# Altium PCB Solenoid-Board-v2.0.PcbDoc (part 2 of 3)
Units mil, origin at the board's own origin, x right, y up, seen from the top; angles counter-clockwise.
Board outline 3149.61 x 4330.71 mil, 2 copper layers (Top Layer, Bottom Layer), stack 61.811 mil thick; 169 components, 111 nets, 466 pads, 161 vias.
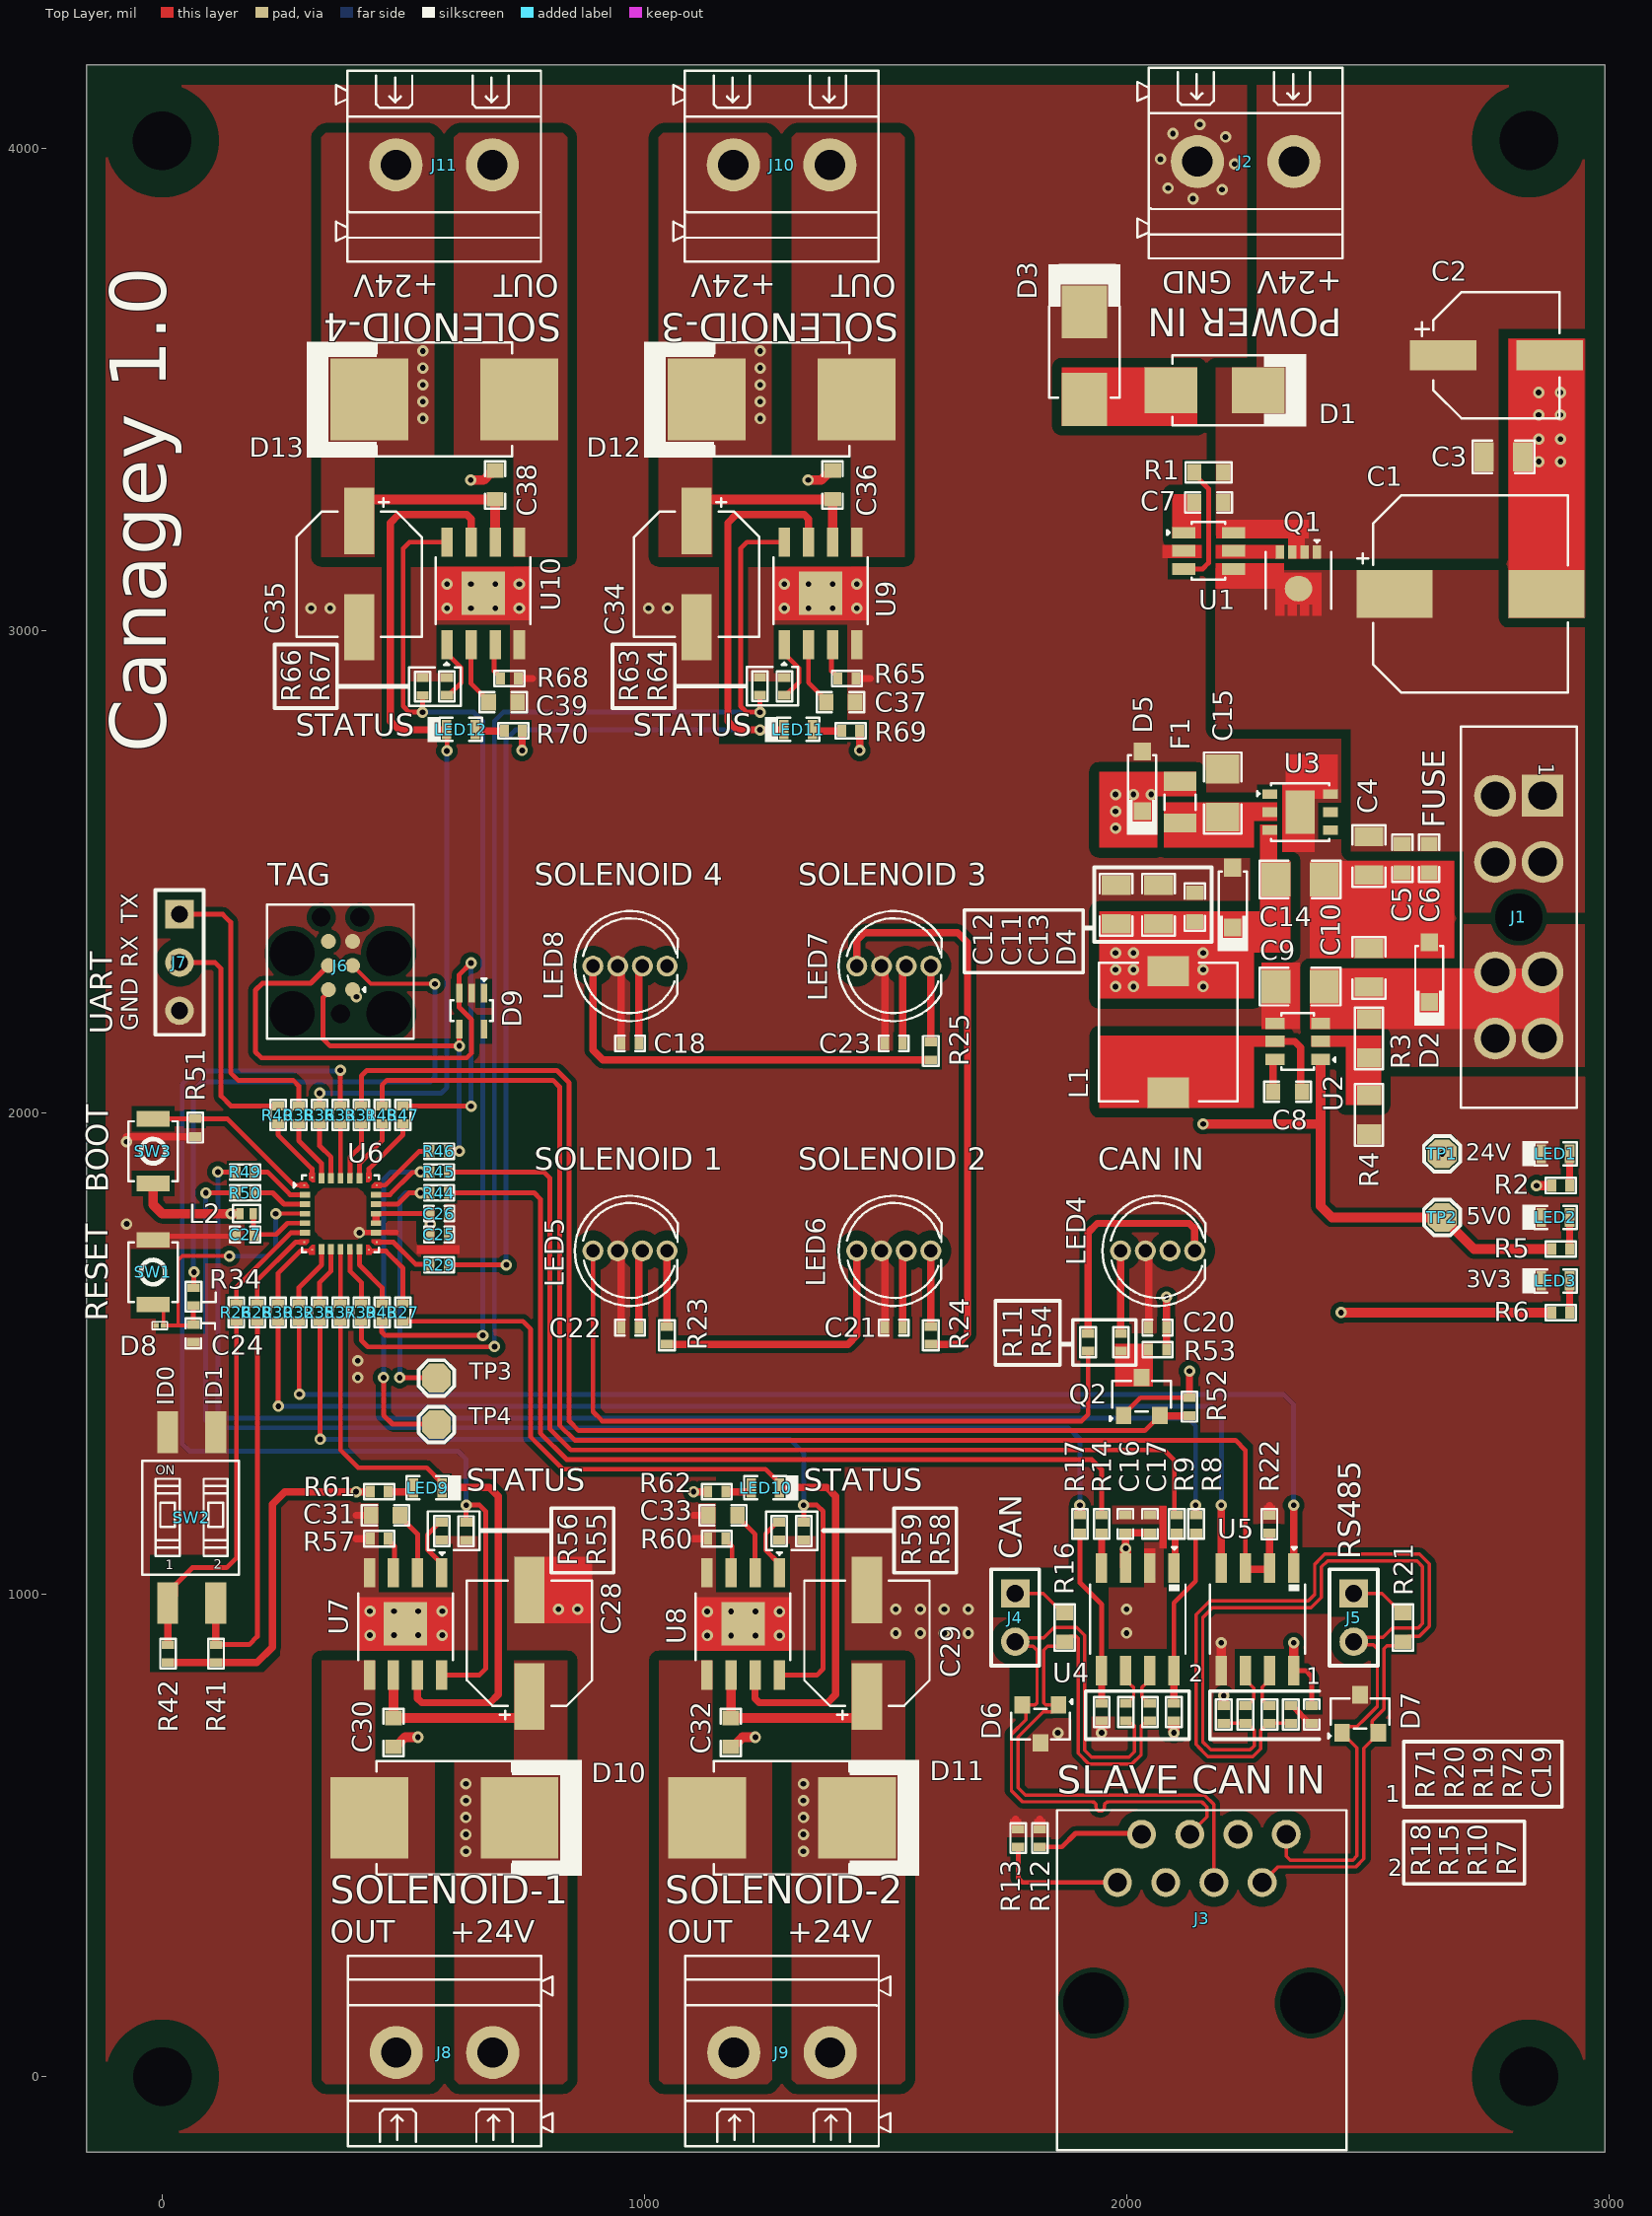
[diagram p0: Top Layer view]

## Part data (continued)
LED4 LED5 LED6 LED7 LED8: "Plugin,D=5mm RGB LEDs ROHS", LCSC Part Number=C190565, Manufacturer=Worldsemi, Package=Plugin,D=5mm, ComponentLink1Description=LCSC, ComponentLink1URL=https://jlcpcb.com/partdetail/Worldsemi-WS2812DF5/C190565, Item Type="RGB LED", Manufacturer Part Number=WS2812D-F5
Q1: "MOSFET N-CH 60V 15A PWRDI3333", Continuous Drain Current (ID)=80A, Drain to Source Voltage (Vdss)=60V, Input Capacitance=2.09nF, LCSC Part Number=C2802568, Manufacturer=Diodes, Max Operating Temperature=150°C, Max Power Dissipation=2.2W, Min Operating Temperature=-55°C, ComponentLink1Description=http://www.mouser.com/ds/2/115/DMT6007LFG-792694.pdf?src-supplier=Mouser, ComponentLink1URL=http://www.mouser.com/ds/2/115/DMT6007LFG-792694.pdf?src-supplier=Mouser, ComponentLink2Description=https://www.diodes.com/assets/Datasheets/DMT6007LFG.pdf?src-supplier=Digikey, ComponentLink2URL=https://www.diodes.com/assets/Datasheets/DMT6007LFG.pdf?src-supplier=Digikey, Item Type=MOSFETs, Manufacturer Part Number=DMT6007LFG-7, Mounting Technology="Surface Mount", Packaging="Cut Tape", Pins=8, Pricing="1=1.33, 10=0.897, 100=0.628, 500=0.50734, 1000=0.46783 (USD)", Rds On Max=6mR, RoHS=Yes, RoHS Compliant=Yes, Series=-, Stock=22065, Supplier=Digikey
Q2: "N-CHANNEL 20-V (D-S) MOSFET", LCSC Part Number=C5310968, Manufacturer="TECH PUBLIC", Manufacturer Part Number=SI2302CDS, Package=SOT-23, ComponentLink1Description=LCSC, ComponentLink1URL=https://www.lcsc.com/product-detail/MOSFETs_TECH-PUBLIC-SI2302CDS_C5310968.html, Item Type=Mosfet
R1: library part RC0603JR-07100KL, "RES 100K OHM 5% 1/10W 0603", Case Code (Imperial)=0603, Case Code (Metric)=1608, LCSC Part Number=C100048, Manufacturer=Yageo, Max Operating Temperature=155°C, Max Power Dissipation=100mW, Min Operating Temperature=-55°C, Resistance=100kR, Resistance Tolerance=5%, Resistor Type="Thick Film", Supplier Part Number 1=311-100KGRCT-ND, Temperature Coefficient=100ppm/°C, Voltage Rating=50V, Case/Package=0603, Category="Chip SMD Resistors", ComponentLink1Description=https://datasheet.ciiva.com/7746/443971-7746424.pdf?src-supplier=Element14, ComponentLink1URL=https://datasheet.ciiva.com/7746/443971-7746424.pdf?src-supplier=Element14, ComponentLink2Description=https://datasheet.ciiva.com/7983/443971-7983686.pdf?src-supplier=Element14, ComponentLink2URL=https://datasheet.ciiva.com/7983/443971-7983686.pdf?src-supplier=Element14, ComponentLink3Description=https://datasheet.ciiva.com/7746/443971-7746423.pdf?src-supplier=Element14, ComponentLink3URL=https://datasheet.ciiva.com/7746/443971-7746423.pdf?src-supplier=Element14, ComponentLink4Description=https://datasheet.ciiva.com/8887/pyu-rc0603-51-rohs-l-4-8887903.pdf?src-supplier=Avnet, ComponentLink4URL=https://datasheet.ciiva.com/8887/pyu-rc0603-51-rohs-l-4-8887903.pdf?src-supplier=Avnet, Contact Plating=Tin,Matte, Features="Moisture Resistant", Item Type=Resistor, Lead Free="Lead Free", Manufacturer Part Number=RC0603JR-07100KL, Number of Pins=2, Number of Terminations=2, Packaging="Tape and Reel", Power Rating=100mW, Pricing 1="1=0.10000, 10=0.02000, 100=0.00800, 1000=0.00360, 2500=0.00312 (USD)", Radiation Hardening=No, REACH SVHC="No SVHC", RoHS=Yes, RoHS Compliant=Yes, Series=RC, Size Code=0603, Stock 1=1210037, Supplier 1=Digi-Key, Termination=SMD/SMT, Tolerance=5%, Voltage Rating (DC)=50V, Width=0.8mm
R2: library part RC0402FR-073K9L, "RES 3.9K OHM 1% 1/16W 0402", Case Code (Imperial)=0402, Case Code (Metric)=1005, LCSC Part Number=C131467, Manufacturer=Yageo, Max Operating Temperature=155°C, Max Power Dissipation=63mW, Min Operating Temperature=-55°C, Power Rating=62.5mW, Resistance Tolerance=1%, Resistor Type="Thick Film", Supplier Part Number=9808155, Temperature Coefficient=100ppm/°C, Voltage Rating=50V, Case/Package=0402, Category="Chip SMD Resistors", ComponentLink1Description=https://datasheet.ciiva.com/12666/pyu-rc0402-51-rohs-l-6-r-12666997.pdf?src-supplier=Mouser, ComponentLink1URL=https://datasheet.ciiva.com/12666/pyu-rc0402-51-rohs-l-6-r-12666997.pdf?src-supplier=Mouser, ComponentLink2Description=https://datasheet.ciiva.com/7849/1018594-7849989.pdf?src-supplier=Element14, ComponentLink2URL=https://datasheet.ciiva.com/7849/1018594-7849989.pdf?src-supplier=Element14, ComponentLink3Description=https://datasheet.ciiva.com/7849/1018594-7849990.pdf?src-supplier=Element14, ComponentLink3URL=https://datasheet.ciiva.com/7849/1018594-7849990.pdf?src-supplier=Element14, ComponentLink4Description=https://datasheet.ciiva.com/15189/getdatasheetpartid-469246-15189453.pdf?src-supplier=Verical, ComponentLink4URL=https://datasheet.ciiva.com/15189/getdatasheetpartid-469246-15189453.pdf?src-supplier=Verical, Construction=Rectangular, Depth=0.5mm, Features="Moisture Resistant", Item Type=Resistor, Lead Free="Lead Free", Length=1mm, Manufacturer Part Number=RC0402FR-073K9L, Military Standard=Not, Number of Terminations=2, Packaging="Tape and Reel", Pricing="10000=0.0011, 100000=0.0011, 300000=0.001, 750000=0.001, 2000000=0.0009 (USD)", Reach SVHC Compliant=Unknown, RoHS=Yes, RoHS Compliant=Yes, Series=RC, Stock=6910000, Supplier="Future Electronics", Termination=SMD/SMT, Tolerance=1%, Voltage Rating (AC)=50V
R3: library part RT0805BRD07698KL, "RES SMD 698K OHM 0.1% 1/8W 0805", Case Code (Imperial)=0805, Case Code (Metric)=2012, LCSC Part Number=C865618, Manufacturer=Yageo, Max Operating Temperature=155°C, Max Power Dissipation=125mW, Min Operating Temperature=-55°C, Package Quantity=5000, Temperature Coefficient=25ppm/°C, Tolerance=0.1%, Voltage Rating=150V, Case/Package=0805, ComponentLink1Description=https://datasheet.ciiva.com/2585/pyu-rt-1-to-0-05-rohs-l-4-2585147.pdf?src-supplier=Digikey, ComponentLink1URL=https://datasheet.ciiva.com/2585/pyu-rt-1-to-0-05-rohs-l-4-2585147.pdf?src-supplier=Digikey, ComponentLink2Description=https://datasheet.ciiva.com/46635/pyu-rt-1-to-0-05-rohs-l-5-46635259.pdf?src-supplier=Digikey, ComponentLink2URL=https://datasheet.ciiva.com/46635/pyu-rt-1-to-0-05-rohs-l-5-46635259.pdf?src-supplier=Digikey, ComponentLink3Description=https://datasheet.ciiva.com/12705/pyu-rt-1-to-0-05-rohs-l-4-12705823.pdf?src-supplier=Mouser, ComponentLink3URL=https://datasheet.ciiva.com/12705/pyu-rt-1-to-0-05-rohs-l-4-12705823.pdf?src-supplier=Mouser, Features="Moisture Resistant", Height=0.024inch, Item Type=Resistor, Lead Free="Lead Free", Length=0.079inch, Manufacturer Part Number=RT0805BRD07698KL, Number of Terminations=2, Packaging="Tape and Reel", Power Rating=125mW, Pricing="1=0.16, 10=0.122, 50=0.0968, 100=0.0867, 500=0.0663, 1000=0.05814 (USD)", RoHS=Yes, RoHS Compliant=Yes, Series=RT, Stock=881, Supplier=Digikey, Termination=SMD/SMT, Voltage Rating (DC)=150V, Width=0.049inch
R4: library part RT0805BRD0751K1L, "RES SMD 51.1K OHM 0.1% 1/8W 0805", Case Code (Imperial)=0805, Case Code (Metric)=2012, LCSC Part Number=C865541, Manufacturer=Yageo, Max Operating Temperature=155°C, Max Power Dissipation=125mW, Min Operating Temperature=-55°C, Package Quantity=5000, Temperature Coefficient=25ppm/°C, Tolerance=0.1%, Voltage Rating=150V, Case/Package=0805, ComponentLink1Description=https://datasheet.ciiva.com/12811/pyu-rt-1-to-0-05-rohs-l-4-12811148.pdf?src-supplier=Mouser, ComponentLink1URL=https://datasheet.ciiva.com/12811/pyu-rt-1-to-0-05-rohs-l-4-12811148.pdf?src-supplier=Mouser, ComponentLink2Description=https://datasheet.ciiva.com/2585/pyu-rt-1-to-0-05-rohs-l-5-2585074.pdf?src-supplier=Digikey, ComponentLink2URL=https://datasheet.ciiva.com/2585/pyu-rt-1-to-0-05-rohs-l-5-2585074.pdf?src-supplier=Digikey, Height=0.024inch, Item Type=Resistors, Lead Free="Lead Free", Length=0.079inch, Manufacturer Part Number=RT0805BRD0751K1L, Number of Terminations=2, Packaging="Tape and Reel", Power Rating=125mW, Pricing="1=0.16, 10=0.122, 50=0.0968, 100=0.0867, 500=0.0663, 1000=0.05814 (USD)", RoHS=Yes, RoHS Compliant=Yes, Series=RT, Stock=5132, Supplier=Digikey, Termination=SMD/SMT, Voltage Rating (DC)=150V, Weight=0.000194oz, Width=1.2mm
R5: library part RC0402FR-07499RL, "RES 499 OHM 1% 1/16W 0402", Case Code (Imperial)=0402, Case Code (Metric)=1005, LCSC Part Number=C137970, Manufacturer=Yageo, Max Operating Temperature=155°C, Max Power Dissipation=63mW, Min Operating Temperature=-55°C, Package Quantity=1, Power Rating=62.5mW, Resistance Tolerance=1%, Resistor Type="Thick Film", Supplier Part Number 1=603-RC0402FR-07499RL, Temperature Coefficient=100ppm/°C, Voltage Rating=50V, Case/Package=0402, Category="Chip SMD Resistors", ComponentLink1Description=https://datasheet.ciiva.com/2453/pyu-r-int-thick-7-2453539.pdf?src-supplier=Digi-Key, ComponentLink1URL=https://datasheet.ciiva.com/2453/pyu-r-int-thick-7-2453539.pdf?src-supplier=Digi-Key, ComponentLink2Description=https://datasheet.ciiva.com/2453/pyu-r-int-thick-7-2453540.pdf?src-supplier=Digi-Key, ComponentLink2URL=https://datasheet.ciiva.com/2453/pyu-r-int-thick-7-2453540.pdf?src-supplier=Digi-Key, ComponentLink3Description=https://datasheet.ciiva.com/2453/pyu-r-int-thick-7-2453538.pdf?src-supplier=Digi-Key, ComponentLink3URL=https://datasheet.ciiva.com/2453/pyu-r-int-thick-7-2453538.pdf?src-supplier=Digi-Key, Construction=Rectangular, Depth=0.5mm, Features="Moisture Resistant", Height=0.016inch, Lead Free="Lead Free", Length=1mm, Manufacturer Part Number=RC0402FR-07499RL, Military Standard=Not, Number of Terminations=2, Packaging="Tape and Reel", Pricing 1="1=0.10000, 10=0.01200, 50=0.01200, 100=0.00500, 1000=0.00300, 10000=0.00100 (USD)", REACH SVHC="No SVHC", Resistance=499R, RoHS=Yes, RoHS Compliant=Yes, Series=RC, Size Code=0402, Stock 1=936879, Supplier 1=Mouser, Termination=SMD/SMT, Tolerance=1%, Voltage Rating (DC)=50V, Width=0.02inch
R6 R61 R62 R69 R70: library part RC0402FR-07240RL, "RES 240 OHM 1% 1/16W 0402", Case Code (Imperial)=0402, Case Code (Metric)=1005, LCSC Part Number=C114755, Manufacturer=Yageo, Max Operating Temperature=155°C, Max Power Dissipation=63mW, Min Operating Temperature=-55°C, Package Quantity=1, Resistance Tolerance=1%, Resistor Type="Thick Film", Supplier Part Number 1=603-RC0402FR-07240RL, Temperature Coefficient=100ppm/°C, Voltage Rating=50V, Case/Package=0402, ComponentLink1Description=https://datasheet.ciiva.com/7849/1018594-7849915.pdf?src-supplier=Element14, ComponentLink1URL=https://datasheet.ciiva.com/7849/1018594-7849915.pdf?src-supplier=Element14, ComponentLink2Description=https://datasheet.ciiva.com/7849/1018594-7849916.pdf?src-supplier=Element14, ComponentLink2URL=https://datasheet.ciiva.com/7849/1018594-7849916.pdf?src-supplier=Element14, ComponentLink3Description=https://datasheet.ciiva.com/2519/pyu-r-int-thick-7-2519157.pdf?src-supplier=Digi-Key, ComponentLink3URL=https://datasheet.ciiva.com/2519/pyu-r-int-thick-7-2519157.pdf?src-supplier=Digi-Key, ComponentLink4Description=https://datasheet.ciiva.com/2519/pyu-r-int-thick-7-2519158.pdf?src-supplier=Digi-Key, ComponentLink4URL=https://datasheet.ciiva.com/2519/pyu-r-int-thick-7-2519158.pdf?src-supplier=Digi-Key, ComponentLink5Description=https://datasheet.ciiva.com/2519/pyu-r-int-thick-7-2519156.pdf?src-supplier=Digi-Key, ComponentLink5URL=https://datasheet.ciiva.com/2519/pyu-r-int-thick-7-2519156.pdf?src-supplier=Digi-Key, ComponentLink6Description=https://datasheet.ciiva.com/12669/pyu-rc0402-51-rohs-l-6-r-12669689.pdf?src-supplier=Mouser, ComponentLink6URL=https://datasheet.ciiva.com/12669/pyu-rc0402-51-rohs-l-6-r-12669689.pdf?src-supplier=Mouser, ComponentLink7Description=https://datasheet.ciiva.com/17419/pyu-rc0402-51-rohs-l-6-r-17419482.pdf?src-supplier=Future+Electronics, ComponentLink7URL=https://datasheet.ciiva.com/17419/pyu-rc0402-51-rohs-l-6-r-17419482.pdf?src-supplier=Future+Electronics, Construction=Rectangular, Depth=0.5mm, Features="Moisture Resistant", Height=0.016inch, Item Type=Resistors, Lead Free="Lead Free", Length=1mm, Manufacturer Part Number=RC0402FR-07240RL, Military Standard=Not, Number of Terminations=2, Packaging="Tape and Reel", Power Rating=63mW, Pricing 1="1=0.10000, 10=0.01200, 50=0.01200, 100=0.00500, 1000=0.00300, 10000=0.00100 (USD)", REACH SVHC=Unknown, Resistance=240R, RoHS=Yes, RoHS Compliant=Yes, Series=RC, Size Code=0402, Stock 1=1903202, Supplier 1=Mouser, Termination=SMD/SMT, Tolerance=1%, Voltage Rating (DC)=50V, Width=0.02inch
R7 R18 R22 R41 R42 R51 R52 R53 R55 R58 R63 R66: library part RC0402FR-0710KL, "RES 10K OHM 1% 1/16W 0402", Case Code (Imperial)=0402, Case Code (Metric)=1005, LCSC Part Number=C60490, Manufacturer=Yageo, Max Operating Temperature=155°C, Max Power Dissipation=63mW, Min Operating Temperature=-55°C, Power Rating=62.5mW, Resistance=10kR, Resistance Tolerance=1%, Resistor Type="Thick Film", Supplier Part Number 1=603-RC0402FR-0710KL, Temperature Coefficient=100ppm/°C, Voltage Rating=50V, Case/Package=0402, Category="Chip SMD Resistors", ComponentLink1Description=https://datasheet.ciiva.com/7660/38568-7660787.pdf?src-supplier=Element14, ComponentLink1URL=https://datasheet.ciiva.com/7660/38568-7660787.pdf?src-supplier=Element14, ComponentLink2Description=https://datasheet.ciiva.com/7849/1686128-7849814.pdf?src-supplier=Element14, ComponentLink2URL=https://datasheet.ciiva.com/7849/1686128-7849814.pdf?src-supplier=Element14, ComponentLink3Description=https://datasheet.ciiva.com/7983/1018594-7983486.pdf?src-supplier=Element14, ComponentLink3URL=https://datasheet.ciiva.com/7983/1018594-7983486.pdf?src-supplier=Element14, ComponentLink4Description=https://datasheet.ciiva.com/22747/1018594-22747512.pdf?src-supplier=Element14, ComponentLink4URL=https://datasheet.ciiva.com/22747/1018594-22747512.pdf?src-supplier=Element14, ComponentLink5Description=https://datasheet.ciiva.com/12667/pyu-rc0402-51-rohs-l-6-r-12667067.pdf?src-supplier=Mouser, ComponentLink5URL=https://datasheet.ciiva.com/12667/pyu-rc0402-51-rohs-l-6-r-12667067.pdf?src-supplier=Mouser, ComponentLink6Description=https://datasheet.ciiva.com/7849/1784430-7849813.pdf?src-supplier=Element14, ComponentLink6URL=https://datasheet.ciiva.com/7849/1784430-7849813.pdf?src-supplier=Element14, ComponentLink7Description=https://datasheet.ciiva.com/7849/1784430-7849815.pdf?src-supplier=Element14, ComponentLink7URL=https://datasheet.ciiva.com/7849/1784430-7849815.pdf?src-supplier=Element14, Construction=Rectangular, Depth=0.5mm, Features="Moisture Resistant", Height=0.32mm, Item Type=Resistor, Lead Free="Lead Free", Lead Pitch=0.2mm, Length=1mm, Manufacturer Part Number=RC0402FR-0710KL, Military Standard=Not, Number of Pins=2, Number of Terminations=2, Packaging="Tape and Reel", Pricing 1="1=0.10000, 10=0.01400, 50=0.01400, 100=0.00500, 1000=0.00300, 10000=0.00200 (USD)", REACH SVHC="No SVHC", RoHS=Yes, RoHS Compliant=Yes, Series=RC, Stock 1=18648329, Supplier 1=Mouser, Termination=SMD/SMT, Tolerance=1%, Voltage Rating (DC)=50V, Width=0.5mm, Working Voltage=50V
R8 R9 R10 R12 R13 R14 R15 R17 R19 R20 R26 R27 R28 R29 R30 R31 R32 R33 R34 R35 R36 R37 R38 R39 R40 R43 R44 R45 R46 R47 R48 R49 R50: library part RC0402FR-070RL, "RES 0 OHM JUMPER 1/16W 0402", Case Code (Imperial)=0402, Case Code (Metric)=1005, LCSC Part Number=C106231, Manufacturer=Yageo, Max Operating Temperature=155°C, Max Power Dissipation=63mW, Min Operating Temperature=-55°C, Power Rating=62.5mW, Resistor Type="Thick Film", Supplier Part Number 1=603-RC0402FR-070RL, Temperature Coefficient=200ppm/°C, Tolerance=1%, Voltage Rating=50V, Case/Package=0402, ComponentLink1Description=https://datasheet.ciiva.com/8896/pyu-rc0402-51-rohs-l-6-8896149.pdf?src-supplier=Avnet, ComponentLink1URL=https://datasheet.ciiva.com/8896/pyu-rc0402-51-rohs-l-6-8896149.pdf?src-supplier=Avnet, ComponentLink2Description=https://datasheet.ciiva.com/16790/pyu-rc0402-51-rohs-l-6-r-16790444.pdf?src-supplier=Future+Electronics, ComponentLink2URL=https://datasheet.ciiva.com/16790/pyu-rc0402-51-rohs-l-6-r-16790444.pdf?src-supplier=Future+Electronics, Contact Plating=Tin,Matte, Features="Moisture Resistant", Height=0.35mm, Item Type=Resistors, Lead Free="Lead Free", Length=1mm, Manufacturer Part Number=RC0402FR-070RL, Mount="Surface Mount", Number of Terminations=2, Packaging="Tape and Reel", Pricing 1="1=0.10000, 10=0.01400, 50=0.01400, 100=0.00600, 1000=0.00300, 5000=0.00200, 10000=0.00100 (USD)", Radiation Hardening=No, Resistance=0R, RoHS=Yes, RoHS Compliant=Yes, Series=RC, Size Code=0402, Stock 1=8556842, Supplier 1=Mouser, Termination=SMD/SMT, Width=0.5mm
R11 R23 R24 R25 R54: library part RC0402JR-0775RL, "RES 75 OHM 5% 1/16W 0402", Case Code (Imperial)=0402, Case Code (Metric)=1005, LCSC Part Number=C137841, Manufacturer=Yageo, Max Operating Temperature=155°C, Max Power Dissipation=63mW, Min Operating Temperature=-55°C, Power Rating=62.5mW, Resistance Tolerance=5%, Resistor Type="Thick Film", Supplier Part Number=311-75JRCT-ND, Temperature Coefficient=100ppm/°C, Voltage Rating=50V, Case/Package=0402, ComponentLink1Description=https://datasheet.ciiva.com/7983/1018594-7983612.pdf?src-supplier=Element14, ComponentLink1URL=https://datasheet.ciiva.com/7983/1018594-7983612.pdf?src-supplier=Element14, ComponentLink2Description=https://datasheet.ciiva.com/17082/pyu-rc0402-51-rohs-l-6-r-17082239.pdf?src-supplier=Future+Electronics, ComponentLink2URL=https://datasheet.ciiva.com/17082/pyu-rc0402-51-rohs-l-6-r-17082239.pdf?src-supplier=Future+Electronics, Contact Plating=Tin,Lead, Features="Moisture Resistant", Height=0.35mm, Item Type=Resistor, Lead Free="Lead Free", Length=1mm, Manufacturer Part Number=RC0402JR-0775RL, Number of Terminations=2, Packaging="Tape and Reel", Pins=2, Pricing="1=0.1, 10=0.018, 50=0.0102, 100=0.0083, 500=0.00528, 1000=0.00444, 5000=0.00307 (USD)", Reach SVHC Compliant=No, RoHS=Yes, RoHS Compliant=Yes, Series=RC, Stock=2993323, Supplier=Digikey, Termination=SMD/SMT, Tolerance=5%, Voltage Rating (DC)=50V, Width=0.5mm
R16 R21: library part RC0603FR-07120RL, "RES 120 OHM 1% 1/10W 0603", Case Code (Imperial)=0603, Case Code (Metric)=1608, LCSC Part Number=C114640, Manufacturer=Yageo, Max Operating Temperature=155°C, Max Power Dissipation=100mW, Min Operating Temperature=-55°C, Package Quantity=1, Resistance Tolerance=1%, Resistor Type="Thick Film", Supplier Part Number 1=311-120HRCT-ND, Temperature Coefficient=100ppm/°C, Voltage Rating=50V, Case/Package=0603, Category="Chip SMD Resistors", ComponentLink1Description=https://datasheet.ciiva.com/2553/pyu-r-int-thick-7-2553512.pdf?src-supplier=Digi-Key, ComponentLink1URL=https://datasheet.ciiva.com/2553/pyu-r-int-thick-7-2553512.pdf?src-supplier=Digi-Key, ComponentLink2Description=https://datasheet.ciiva.com/7746/443971-7746248.pdf?src-supplier=Element14, ComponentLink2URL=https://datasheet.ciiva.com/7746/443971-7746248.pdf?src-supplier=Element14, ComponentLink3Description=https://datasheet.ciiva.com/2553/pyu-r-int-thick-7-2553513.pdf?src-supplier=Digi-Key, ComponentLink3URL=https://datasheet.ciiva.com/2553/pyu-r-int-thick-7-2553513.pdf?src-supplier=Digi-Key, ComponentLink4Description=https://datasheet.ciiva.com/7746/443971-7746249.pdf?src-supplier=Element14, ComponentLink4URL=https://datasheet.ciiva.com/7746/443971-7746249.pdf?src-supplier=Element14, ComponentLink5Description=https://datasheet.ciiva.com/2553/pyu-r-int-thick-7-2553514.pdf?src-supplier=Digi-Key, ComponentLink5URL=https://datasheet.ciiva.com/2553/pyu-r-int-thick-7-2553514.pdf?src-supplier=Digi-Key, ComponentLink6Description=https://datasheet.ciiva.com/46395/443971-46395021.pdf?src-supplier=Element14, ComponentLink6URL=https://datasheet.ciiva.com/46395/443971-46395021.pdf?src-supplier=Element14, Construction=Rectangular, Depth=0.8mm, Features="Moisture Resistant", Height=0.022inch, Item Type=Resistor, Lead Free="Lead Free", Length=1.6mm, Manufacturer Part Number=RC0603FR-07120RL, Military Standard=Not, Number of Pins=2, Number of Terminations=2, Packaging="Tape and Reel", Power Rating=100mW, Pricing 1="1=0.10000, 10=0.02400, 100=0.00970, 1000=0.00436, 2500=0.00378 (USD)", REACH SVHC="No SVHC", Resistance=120R, RoHS=Yes, RoHS Compliant=Yes, Series=RC, Size Code=0603, Stock 1=839061, Supplier 1=Digi-Key, Termination=SMD/SMT, Tolerance=1%, Voltage Rating (DC)=50V, Width=0.031inch
R56 R57 R59 R60 R64 R65 R67 R68: library part RC0402FR-071ML, "RES 1M OHM 1% 1/16W 0402", Case Code (Imperial)=0402, Case Code (Metric)=1005, LCSC Part Number=C138033, Manufacturer=Yageo, Max Operating Temperature=155°C, Max Power Dissipation=63mW, Min Operating Temperature=-55°C, Resistance Tolerance=1%, Resistor Type="Thick Film", Supplier Part Number=311-1.00MLRCT-ND, Temperature Coefficient=100ppm/°C, Voltage Rating=50V, Case/Package=0402, Category="Chip SMD Resistors", ComponentLink1Description=https://datasheet.ciiva.com/11808/0900766b80c66297-11808125.pdf?src-supplier=Rs, ComponentLink1URL=https://datasheet.ciiva.com/11808/0900766b80c66297-11808125.pdf?src-supplier=Rs, ComponentLink2Description=https://datasheet.ciiva.com/46394/1018594-46394951.pdf?src-supplier=Element14, ComponentLink2URL=https://datasheet.ciiva.com/46394/1018594-46394951.pdf?src-supplier=Element14, ComponentLink3Description=https://datasheet.ciiva.com/7849/1018594-7849883.pdf?src-supplier=Element14, ComponentLink3URL=https://datasheet.ciiva.com/7849/1018594-7849883.pdf?src-supplier=Element14, ComponentLink4Description=https://datasheet.ciiva.com/7849/1018594-7849882.pdf?src-supplier=Element14, ComponentLink4URL=https://datasheet.ciiva.com/7849/1018594-7849882.pdf?src-supplier=Element14, ComponentLink5Description=https://datasheet.ciiva.com/16741/pyu-rc0402-51-rohs-l-6-r-16741081.pdf?src-supplier=Future+Electronics, ComponentLink5URL=https://datasheet.ciiva.com/16741/pyu-rc0402-51-rohs-l-6-r-16741081.pdf?src-supplier=Future+Electronics, Construction=Rectangular, Depth=0.5mm, Features="Moisture Resistant", Height=0.32mm, Item Type=Resistor, Lead Free=5697LeadFree, Length=1mm, Manufacturer Part Number=RC0402FR-071ML, Military Standard=Not, Number of Terminations=2, Packaging="Tape and Reel", Power Rating=63mW, Pricing="1=0.1, 10=0.015, 50=0.0088, 100=0.0073, 500=0.00488, 1000=0.00417, 5000=0.00297 (USD)", Reach SVHC Compliant=Unknown, RoHS=Yes, RoHS Compliant=Yes, Series=RC, Stock=6516, Supplier=Digikey, Technology="THICK FILM", Termination=SMD/SMT, Tolerance=1%, Voltage Rating (AC)=50V
R71 R72: library part RC0402FR-07560RL, "RES 560 OHM 1% 1/16W 0402", Case Code (Imperial)=0402, Case Code (Metric)=1005, LCSC Part Number=C163460, Manufacturer=Yageo, Max Operating Temperature=155°C, Max Power Dissipation=63mW, Min Operating Temperature=-55°C, Package Quantity=1, Resistance Tolerance=1%, Resistor Type="Thick Film", Supplier Part Number=8872046, Temperature Coefficient=100ppm/°C, Voltage Rating=50V, Case/Package=0402, Category="Chip SMD Resistors", ComponentLink1Description=https://datasheet.ciiva.com/2453/pyu-r-int-thick-7-2453458.pdf?src-supplier=Digikey, ComponentLink1URL=https://datasheet.ciiva.com/2453/pyu-r-int-thick-7-2453458.pdf?src-supplier=Digikey, ComponentLink2Description=https://datasheet.ciiva.com/2453/pyu-r-int-thick-7-2453459.pdf?src-supplier=Digikey, ComponentLink2URL=https://datasheet.ciiva.com/2453/pyu-r-int-thick-7-2453459.pdf?src-supplier=Digikey, ComponentLink3Description=https://datasheet.ciiva.com/2453/pyu-r-int-thick-7-2453457.pdf?src-supplier=Digikey, ComponentLink3URL=https://datasheet.ciiva.com/2453/pyu-r-int-thick-7-2453457.pdf?src-supplier=Digikey, ComponentLink4Description=https://datasheet.ciiva.com/12558/pyu-rc0402-51-rohs-l-6-r-8721-12558383.pdf?src-supplier=Mouser, ComponentLink4URL=https://datasheet.ciiva.com/12558/pyu-rc0402-51-rohs-l-6-r-8721-12558383.pdf?src-supplier=Mouser, ComponentLink5Description=https://datasheet.ciiva.com/7850/1018594-7850042.pdf?src-supplier=Element14, ComponentLink5URL=https://datasheet.ciiva.com/7850/1018594-7850042.pdf?src-supplier=Element14, ComponentLink6Description=https://datasheet.ciiva.com/7850/1018594-7850043.pdf?src-supplier=Element14, ComponentLink6URL=https://datasheet.ciiva.com/7850/1018594-7850043.pdf?src-supplier=Element14, Construction=Rectangular, Depth=0.5mm, Features="Moisture Resistant", Height=0.016inch, Item Type=Resistor, Lead Free="Lead Free", Length=1mm, Manufacturer Part Number=RC0402FR-07560RL, Military Standard=Not, Number of Terminations=2, Packaging="Tape and Reel", Power Rating=63mW, Pricing="10000=0.0012, 100000=0.0011, 300000=0.0011, 1250000=0.001, 3000000=0.0009 (USD)", Reach SVHC Compliant=Unknown, RoHS=Yes, RoHS Compliant=Yes, Series=RC, Stock=1360000, Supplier="Future Electronics", Termination=SMD/SMT, Tolerance=1%, Width=0.02inch
SW1 SW3: "SWITCH TACTILE SPST-NO 0.05A 12V", Contact Current Rating=50mA, Contact Resistance=100mR, Insulation Resistance=100MR, LCSC Part Number=C231329, Manufacturer=Omron, Max Operating Temperature=70°C, Max Voltage Rating (DC)=12V, Min Operating Temperature=-25°C, Operating Force=1.5N, Package Quantity=1, Ratings="Dust Proof,IP40", Supplier Part Number 1=SW1020DKR-ND, Actuator Length=0.4mm, Actuator Type=Standard, ComponentLink1Description=http://www.farnell.com/datasheets/60838.pdf?src-supplier=Farnell, ComponentLink1URL=http://www.farnell.com/datasheets/60838.pdf?src-supplier=Farnell, ComponentLink2Description=http://www.farnell.com/datasheets/60838.pdf?src-supplier=Element14, ComponentLink2URL=http://www.farnell.com/datasheets/60838.pdf?src-supplier=Element14, ComponentLink3Description=https://omronfs.omron.com/en_US/ecb/products/pdf/en-b3u.pdf?src-supplier=Digi-Key, ComponentLink3URL=https://omronfs.omron.com/en_US/ecb/products/pdf/en-b3u.pdf?src-supplier=Digi-Key, ComponentLink4Description=http://www.omron.com/ecb/products/pdf/en-b3u.pdf?src-supplier=Digi-Key, ComponentLink4URL=http://www.omron.com/ecb/products/pdf/en-b3u.pdf?src-supplier=Digi-Key, ComponentLink5Description=https://www.distrelec.biz/Web/Downloads/he/et/B3U_eng_datasheet.pdf?mime=application%2Fpdf&src-supplier=Distrelec, ComponentLink5URL=https://www.distrelec.biz/Web/Downloads/he/et/B3U_eng_datasheet.pdf?mime=application%2Fpdf&src-supplier=Distrelec, ComponentLink6Description=http://www.onlinecomponents.com/productFiles/mf-OM/en-b3u.pdf?src-supplier=Onlinecomponents.com, ComponentLink6URL=http://www.onlinecomponents.com/productFiles/mf-OM/en-b3u.pdf?src-supplier=Onlinecomponents.com, ComponentLink7Description=https://www.verical.com/server-webapp/html/getDatasheet?partID=552554&src-supplier=Verical, ComponentLink7URL=https://www.verical.com/server-webapp/html/getDatasheet?partID=552554&src-supplier=Verical, ComponentLink8Description=http://www.farnell.com/datasheets/1685550.pdf?src-supplier=Element14, ComponentLink8URL=http://www.farnell.com/datasheets/1685550.pdf?src-supplier=Element14, ComponentLink9Description=http://www.farnell.com/datasheets/2610940.pdf?src-supplier=Farnell, ComponentLink9URL=http://www.farnell.com/datasheets/2610940.pdf?src-supplier=Farnell, ComponentLink10Description=https://www.alliedelec.com/m/d/4c8a9ef82804fc3c241a13c1e298fd73.pdf?src-supplier=Allied+Electronics, ComponentLink10URL=https://www.alliedelec.com/m/d/4c8a9ef82804fc3c241a13c1e298fd73.pdf?src-supplier=Allied+Electronics, Contact Material=Silver, Current Rating=50mA, Depth=2.5mm, Electrical Life=200000Cycles, Height=1.2mm, Illumination Type=Non-Illuminated,Illuminated, Item Type=Switch, Lead Free="Lead Free", Length=4mm, Manufacturer Part Number=B3U-1000P, Max Current Rating=50mA, Mechanical Life=200000Cycles, Mount="Surface Mount", Orientation=Straight, Packaging="Tape and Reel", Pricing 1="1=1, 10=0.961, 25=0.9064, 50=0.7976, 100=0.7251, 250=0.68888, 500=0.67074, 1000=0.52571 (USD)", REACH SVHC=Unknown, Stock 1=116454, Supplier 1=Digi-Key, Switch Function=Off-Mom, Switch Travel=0.15mm, Termination=SMD/SMT, Throw Configuration=SPST, Voltage Rating (DC)=12V, Weight=0.000776oz, Width=3mm
SW2: "2 positions SPST Black Flat Toggle, Raised Style SMD-4P,5.1x6mm DIP Switches ROHS", LCSC Part Number=C54949, Manufacturer=DongGuan, Package=SMD-4P,5.1x6mm, ComponentLink1Description=LCSC, ComponentLink1URL=https://www.lcsc.com/product-detail/DIP-Switches_DongGuan-KINGTEK-Industrial-Co-LTD-DSIC02LSGET_C54949.html?s_z=n_DSIC02LSGET, Item Type=Switch, Manufacturer Part Number=DSIC02LSGET
TP1 TP2 TP3 TP4: "Test Point ON", Item Type="TEST POINT"
U1: "OR Controller N+1 ORing Controller N-Channel 1:1 SOT-23-6", Case/Package=SOT-23-6, LCSC Part Number=C2941042, Manufacturer="Texas Instruments", Max Operating Temperature=125°C, Max Output current=5A, Max Supply Voltage=65V, Min Operating Temperature=-40°C, Min Supply Voltage=3.2V, Nominal Supply Current=80uA, Supplier Part Number=595-LM74700QDBVRQ1, Category="Power Management ICs", ComponentLink1Description=http://www.ti.com/general/docs/suppproductinfo.tsp?distId=10&amp;gotoUrl=http%3A%2F%2Fwww.ti.com%2Flit%2Fgpn%2Flm74700-q1&src-supplier=Digikey, ComponentLink1URL=http://www.ti.com/general/docs/suppproductinfo.tsp?distId=10&amp;gotoUrl=http%3A%2F%2Fwww.ti.com%2Flit%2Fgpn%2Flm74700-q1&src-supplier=Digikey, Height=1.45mm, Item Type=IC, Length=2.9mm, Manufacturer Part Number=LM74700QDBVRQ1, Mounting Technology="Surface Mount", Number of Outputs=1NUMBER, Pins=6NUMBER, Pricing="1=1.78, 10=1.6, 50=1.6, 100=1.28, 1000=0.877, 10000=0.756 (USD)", RoHS=Yes, RoHS Compliant=Yes, Series="Automotive, AEC-Q100", Stock=11505, Supplier=Mouser, Thickness=1.2mm, Turn-Off Delay Time=450ns, Turn-On Delay Time=1.4us, Width=1.6mm
U2: "IC REG BUCK 5V 2A TSOT26", LCSC Part Number=C2071056, Manufacturer=Diodes, Supplier Part Number 1=AP63205WU-7DICT-ND, Category="Voltage Regulators - Switching", Item Type=IC, Manufacturer Part Number=AP63205WU-7, Pricing 1="1=0.88, 10=0.776, 25=0.7292, 100=0.5952, 250=0.55284, 500=0.4705, 1000=0.3764 (USD)", RoHS=Yes, Stock 1=88525, Supplier 1=Digi-Key
U3: "IC REG LINEAR 3.3V 1.3A 6DFN", LCSC Part Number=C283488, Manufacturer=STMicroelectronics, ComponentLink1Description=https://datasheet.ciiva.com/2053/cd00186925-2053848.pdf?src-supplier=Digikey, ComponentLink1URL=https://datasheet.ciiva.com/2053/cd00186925-2053848.pdf?src-supplier=Digikey, ComponentLink2Description=https://datasheet.ciiva.com/2053/cd00186925-2053849.pdf?src-supplier=Digikey, ComponentLink2URL=https://datasheet.ciiva.com/2053/cd00186925-2053849.pdf?src-supplier=Digikey, ComponentLink3Description=https://datasheet.ciiva.com/2053/cd00186925-2053850.pdf?src-supplier=Digikey, ComponentLink3URL=https://datasheet.ciiva.com/2053/cd00186925-2053850.pdf?src-supplier=Digikey, ComponentLink4Description=https://datasheet.ciiva.com/16489/cd00186925-16489850.pdf?src-supplier=Future+Electronics, ComponentLink4URL=https://datasheet.ciiva.com/16489/cd00186925-16489850.pdf?src-supplier=Future+Electronics, Item Type=IC, Manufacturer Part Number=ST1L05APU33R, Pricing="1=1.06, 10=0.766, 25=0.692, 100=0.6103, 250=0.57136, 500=0.5479, 1000=0.5286 (USD)", RoHS=Yes, Stock=7599, Supplier=Digikey
U4: "IC TRANSCEIVER HALF 1/1 8SOIC", Case/Package=SOIC, LCSC Part Number=C22396693, Manufacturer="Texas Instruments", Height=1.75mm, Item Type=IC, Length=4.9mm, Manufacturer Part Number=TCAN3414DR, Pins=8, Pricing="1=1.55, 10=1.1, 50=1.1, 100=0.895, 1000=0.763, 10000=0.681 (USD)", RoHS=No, Stock=201, Supplier=Mouser, Thickness=1.58mm, Width=3.91mm
U5: "IC TRANSCEIVER HALF 1/1 8SOIC", LCSC Part Number=C3235059, Manufacturer="Texas Instruments", Item Type=IC, Manufacturer Part Number=THVD1449DR, Pricing="1=3.62, 10=2.51, 50=2.51, 100=2.27, 1000=2.02, 10000=1.95 (USD)", RoHS=No, Stock=7454, Supplier=Mouser
U6: "IC MCU 32BIT 32KB FLASH 28UFQFPN", Case/Package=UFQFPN, Clock Frequency=48MHz, LCSC Part Number=C961597, Manufacturer=STMicroelectronics, Max Operating Temperature=85°C, Max Power Dissipation=170mW, Max Supply Voltage=3.6V, Min Operating Temperature=-40°C, Min Supply Voltage=2V, Nominal Supply Current=1.7uA, Package Quantity=2940, ComponentLink1Description=https://datasheet.ciiva.com/48494/dm00105814-48494126.pdf?src-supplier=Avnet, ComponentLink1URL=https://datasheet.ciiva.com/48494/dm00105814-48494126.pdf?src-supplier=Avnet, Core Architecture=ARM, Data Bus Width=32b, Frequency=48MHz, Height=600um, Interface=I2C,SPI,USB,CAN,USART,HDMI,IrDA,UART,LIN,I2S, Item Type=IC, Lead Free="Lead Free", Manufacturer Part Number=STM32F042G6U6, Memory Format=FLASH, Memory Size=32KB, Number of A/D Converters=1NUMBER, Number of ADC Channels=13, Number of Channels=10NUMBER, Number of I2C Channels=1NUMBER, Number of I/Os=24, Number of Programmable I/O=24, Number of PWM Channels=6NUMBER, Number of SPI Channels=1NUMBER, Number of Timers/Counters=6, Number of UART Channels=2NUMBER, Number of USB Channels=1NUMBER, Oscillator Type=Internal, Packaging=Tray, Peripherals=POR,PWM,WDT,DMA, Pins=28, Pricing="1=2.78, 10=1.83, 50=1.83, 100=1.72, 1000=1.56, 10000=1.5 (USD)", Radiation Hardening=No, RAM Size=6KB, Reach SVHC Compliant=No, RoHS=Yes, RoHS Compliant=Yes, Series="STM32 F0", Stock=43229, Supplier=Mouser, Watchdog Timer=Yes
U7 U8 U9 U10: "IC PWR DRVR N-CHAN 1:1 8SOPWRPAD", LCSC Part Number=C544418, Manufacturer="Texas Instruments", ComponentLink1Description=https://datasheet.ciiva.com/15110/getdatasheetpartid-547625-15110691.pdf?src-supplier=Verical, ComponentLink1URL=https://datasheet.ciiva.com/15110/getdatasheetpartid-547625-15110691.pdf?src-supplier=Verical, ComponentLink2Description=https://datasheet.ciiva.com/1958/drv103-1958756.pdf?src-supplier=Digikey, ComponentLink2URL=https://datasheet.ciiva.com/1958/drv103-1958756.pdf?src-supplier=Digikey, ComponentLink3Description=https://datasheet.ciiva.com/1958/drv103-1958757.pdf?src-supplier=Digikey, ComponentLink3URL=https://datasheet.ciiva.com/1958/drv103-1958757.pdf?src-supplier=Digikey, ComponentLink4Description=https://datasheet.ciiva.com/1958/drv103-1958758.pdf?src-supplier=Digikey, ComponentLink4URL=https://datasheet.ciiva.com/1958/drv103-1958758.pdf?src-supplier=Digikey, Height=1.7mm, Item Type=IC, Lead Free=5697LeadFree, Length=4.89mm, Manufacturer Part Number=DRV103H/2K5, Number of Channels=1NUMBER, Pricing="1=4.53, 10=3.85, 50=3.85, 100=3.33, 1000=2.39, 10000=2.24 (USD)", RoHS=Yes, RoHS Compliant=5897YesNo, Stock=2092, Supplier=Mouser, Thickness=1.48mm, Width=3.9mm

## Free pads (board coordinates)
  round 0 hole 122.05: MH1(-0.74,4015.75) MH1(0,0) MH1(2834.28,0.37) MH1(2834.28,4016.12)

## Via types
v1: diameter 23.62, hole 11.81, Top Layer to Bottom Layer, tented both sides, 161 vias

## Nets (pads, with @x,y where several pads share a name; then routed paths per layer and width w, separated by ;. In a path a pad name is that pad's centre, name@x,y a point inside that pad or via, vN(x,y) a via of type N, cw(c..) or ccw(c..) an arc to the next point about the centre after c; other vN are vias at no path point)
3V3: C16.2 C17.2 C19.2 C25.1 C26.1 D5.2 F1.2 J6.1 L2.2 Q2.1 R6.1 R7.2 R41.2 R42.2 R52.2 R61.2 R62.2 R69.2 R70.2 R71.2 SW3.2 U4.3 U5.8 U6.17 U6.18 | length 2201.6
  Top Layer w4: Q2.1@1993.8,1371.63 Q2.1@1993.8,1373.6
  Top Layer w6: R6.1@2877.89,1584.86 R6.1@2881.92,1584.86
  Top Layer w10: U6.18@443.15,1790.07 C26.1@555.58,1790.06 ; v1@553.74,1770.38 555.57,1768.55 C25.1@555.57,1746.88 ; Q2.1@1993.8,1373.6 2028.45,1408.24 R52.2@2130.08,1408.24 ; U5.8@2346.38,842.45 2371.15,842.45 2384,829.61 C19.2@2384,769.84
  Top Layer w15: R42.2@11.52,859.06 196.06,859.06 228,891 228,1187.48 253.76,1213.24 v1(401.7,1213.24) R61.2@431.22,1213.24 ; U6.17@443.15,1773.13 U6.18@443.15,1788.07 ; v1@746.18,2750.94 R70.2@746.2,2791.51 ; v1(1101.7,1213.24) R62.2@1131.21,1213.23 ; v1@1446.18,2750.94 R69.2@1446.18,2791.49 ; U4.3@1998.09,1055.05 v1(1998.09,1095.67) 1998.08,1127.34 C16.2@1997.59,1127.84 C17.2@2048.09,1127.84 ; v1(2098.09,713.23) v1(2098.09,713.23) R7.2@2098.13,737.89 ; R52.2@2130.04,1408.29 2130.19,1408.44 2130.19,1463.46 v1(2130.3,1463.57)
  Top Layer w20: SW3.2@-18.72,1853.37 SW3.2@-19.36,1852.73 -19.36,1808.59 -0.85,1790.08 v1(142.44,1790.08) L2.2@157.28,1790.08 ; R71.2@2201.38,773.63 v1(2201.38,790.13) ; U5.8@2346.38,842.45 v1(2346.38,900) ; v1(2445,1585) 2877.75,1585 R6.1@2877.89,1584.86
  other v1: 555.81,1768.31 402.47,2240.09 1977,2589.71 2014,2589.71 2051,2589.71 1977,2624.71 1977,2659.71 2014,2659.71 2051,2659.71 746.15,2750.91 1446.15,2750.91
5V: C11.2 C12.2 C13.2 C14.2 C18.2 C20.2 C21.2 C22.2 C23.2 D4.2 L1.2 LED4.2 LED5.2 LED6.2 LED7.2 LED8.2 R5.1 R53.2 TP2.1 U2.1 U3.3 | length 1823.5
  Top Layer w15: C22.2@988.34,1553.57 988.33,1697.46 995.42,1704.55 LED5.2@995.42,1713.57 ; C18.2@988.33,2143.57 988.33,2287.46 995.42,2294.55 LED8.2@995.42,2303.57 ; C21.2@1535.46,1553.57 1535.46,1697.46 1542.55,1704.55 LED6.2@1542.55,1713.57 ; C23.2@1535.46,2143.57 1535.45,2287.46 1542.55,2294.55 LED7.2@1542.55,2303.57 ; C20.2@2082.57,1553.57 v1(2082.57,1616.98) ; R53.2@2082.7,1508.28 C20.2@2082.7,1553.57
  Top Layer w20: v1(2158.66,1976) 2402.11,1976 ; U2.1@2402.11,2110.07 2402.11,1976 ; TP2.1@2654.48,1782.31 2425.69,1782.31 2402.11,1805.89 2402.11,1976 ; TP2.1@2654.89,1782.31 2720.62,1716.58 R5.1@2880.92,1716.58
  other v1: 1977,2261 2014,2261 2158.66,2261 1977,2296 2014,2296 2158.66,2296 1977,2331 2014,2331 2158.66,2331
24V: C9.2 C10.2 C28.1 C29.1 C30.2 C32.2 C34.1 C35.1 C36.2 C38.2 D2.2 D10.1 D11.1 D12.1 D13.1 J1.3 J1.4 J1.5 J1.6 J8.1 J9.1 J10.1 J11.1 R2.1 R3.2 TP1.1 U2.3 U7.6 U8.6 U9.6 U10.6 | length 1640.7
  Top Layer w20: C35.1@408.09,3226.92 408.09,3250.21 429.59,3271.71 C38.2@690.14,3271.71 U10.6@690.15,3182.98 ; U7.6@479.27,832.77 C30.2@479.27,744.05 739.83,744.05 761.33,765.55 C28.1@761.33,788.83 ; C34.1@1108.09,3226.92 1108.09,3250.21 1129.59,3271.7 C36.2@1390.14,3271.7 U9.6@1390.15,3182.98 ; U8.6@1179.27,832.77 C32.2@1179.28,744.04 1439.83,744.04 1461.33,765.54 C29.1@1461.33,788.83 ; v1(2850.11,1848.35) v1(2850.11,1848.35) R2.1@2878.95,1848.3
  other v1: 629.42,467.42 1329.42,467.42 629.42,502.42 1329.42,502.42 629.42,537.42 1329.42,537.42 629.42,572.42 1329.42,572.42 629.42,607.42 1329.42,607.42 2654.48,1914.3 539.99,3439.5 1240,3439.51 539.99,3474.5 1240,3474.51 539.99,3509.5 1240,3509.51 539.99,3544.5 1240,3544.51 539.99,3579.5 1240,3579.51
485_DIN_1: R30.1 U5.4 | length 2455.7
  Top Layer w10: v1@240.18,1390.96 R30.1@240.18,1566.42
  Top Layer w15: R30.1@239.8,1566.81 R30.1@240.18,1566.42 ; v1@240.18,1390.96 v1(240.57,1390.57) ; U5.4@2196.38,1055.05 v1(2196.38,1185.47)
  Bottom Layer w10: v1(240.57,1390.57) 2175.61,1390.57 2196.38,1369.8 v1(2196.38,1185.47)
485_ROUT_1: R32.1 U5.1 | length 2562.2
  Top Layer w10: v1@283.51,1415.9 R32.1@283.51,1566.27
  Top Layer w15: R32.1@282.97,1566.81 R32.1@283.51,1566.27 ; v1@283.51,1415.9 v1(284.05,1415.36) ; U5.1@2346.38,1055.05 v1(2346.38,1185.47)
  Bottom Layer w10: v1(284.05,1415.36) 2325.29,1415.36 2346.38,1394.26 v1(2346.38,1185.47)
AVDD: C27.1 L2.1 U6.5 | length 157.8
  Top Layer w10: C27.1@188.35,1746.89 189.21,1747.75 L2.1@189.21,1789.21 ; C27.1@190.08,1746.89 235.99,1746.89 259.48,1770.38 U6.5@295.51,1770.38
BOOT0: R51.2 SW3.1 U6.1 | length 371.3
  Top Layer w10: SW3.1@-19.36,1986.59 -18.79,1987.16 R51.2@67.93,1987.16 134.44,1987.16 272.48,1849.12 U6.1@294.53,1849.12
CAN1_N: D6.2 J3.5 J4.2 R15.2 | length 1494
  Top Layer w7: R15.2@1998.09,737.84 2003.59,732.34 2011.99,732.34 2016.09,728.24 2016.09,673.95 2004.72,662.58 1927.42,662.58 1913.21,676.79 1913.21,914.96 1896.82,931.35 1849.74,931.35 1828.32,909.93 1776.53,909.93 J4.2@1768.83,902.24 1778.53,892.54 1806,892.54 1814.16,884.37 1814.16,775.19 1810.06,771.09 D6.2@1783.76,771.09 1791.22,763.63 1791.22,740.38 1761,710.16 1761,593.26 1784.16,570.1 1913.21,570.1 1928.32,570.1 cw(c1928.32,561.6) 1936.82,561.6 1936.82,559.18 ccw(c1945.32,559.18) 1953.82,559.18 1953.82,561.6 cw(c1962.32,561.6) 1962.32,570.1 1965.82,570.1 2155.86,570.1 2166.81,559.15 2166.81,538.5 J3.5@2131.04,502.74
CAN1_P: D6.1 J3.4 R10.2 R16.2 | length 1494.2
  Top Layer w7: R10.2@2048.09,737.84 2042.59,732.34 2034.19,732.34 2030.09,728.24 2030.09,668.15 2010.52,648.58 1921.62,648.58 1899.21,671 1899.21,909.17 1895.1,913.27 1882.71,913.27 1861.98,892.54 1836.14,892.54 1828.16,884.56 1828.16,775.19 1832.26,771.09 D6.1@1858.56,771.09 1858.56,769.12 1845.92,756.48 1827.12,756.48 1775,704.36 1775,599.06 1789.96,584.1 2161.66,584.1 2180.81,564.94 J3.4@2180.81,402.97
CAN1_RXD: R14.1 R44.1 | length 1972.3
  Top Layer w10: R44.1@592.57,1833.24 771.2,1833.24 783.87,1820.56 783.87,1334.84 838.72,1280 1927.48,1280 1948.13,1259.35 1948.13,1164.89 R14.1@1948.09,1164.84
CAN1_SHDN: R17.1 R50.1 | length 2512.7
  Top Layer w10: v1(90,1833.24) R50.1@146.08,1833.24 ; v1@1902.55,1184.93 v1(1903.09,1185.47)
  Top Layer w20: R17.1@1903.09,1167.62 v1(1903.09,1185.47)
  Bottom Layer w10: v1(90,1833.24) 90,1360.82 104.91,1345.91 1879.09,1345.91 1903.09,1321.91 v1(1903.09,1185.47)
CAN1_STB: R8.1 R49.1 | length 2754.8
  Top Layer w10: v1(115,1876.42) R49.1@146.08,1876.42
  Top Layer w15: R8.1@2143.08,1164.85 v1(2143.08,1185.47)
  Bottom Layer w10: v1(115,1876.42) 115,1377.24 126.09,1366.15 2127.04,1366.15 2143.08,1350.12 v1(2143.08,1185.47)
CAN1_TXD: R9.1 R45.1 | length 2172.8
  Top Layer w10: R45.1@592.58,1876.42 791.12,1876.42 803.87,1863.66 803.87,1343.13 847,1300 2077.56,1300 2099.13,1278.43 2099.13,1164.89 R9.1@2099.09,1164.85
DI_PA5: LED9.2 R37.1 U7.7 | length 1277.2
  Top Layer w10: R37.1@369.33,1566.81 369.33,1299.67 406,1263 548.19,1263 579.27,1231.92 LED9.2@579.27,1222.07
  Top Layer w15: U7.7@529.27,832.77 529.27,784.53 538.06,775.75 679.69,775.75 696.59,792.65 696.59,1203.77 678.29,1222.07 LED9.2@579.27,1222.07
DI_PB0: LED10.2 R27.1 U8.7 | length 1823.6
  Top Layer w10: R27.1@498.86,1566.81 747.61,1566.81 763.87,1550.55 763.87,1326.56 830.43,1260 1251.19,1260 1280.11,1231.08 LED10.2@1280.11,1221.24
  Top Layer w15: U8.7@1229.27,832.77 1229.27,784.53 1238.06,775.75 1379.69,775.75 1396.59,792.65 1396.59,1203.77 1378.29,1222.07 LED10.2@1279.27,1222.07